# Altium PCB PCB1.PcbDoc (part 4 of 5)
Units mm, origin at the board's own origin, x right, y up, seen from the top; angles counter-clockwise.
Board outline 130 x 90 mm, 4 copper layers (Top Layer, Int 1 (GND), Int 2 (PWR), Bottom Layer), stack 1.466 mm thick; 419 components, 281 nets, 1355 pads, 522 vias.
Unrouted connection lines stored in the file: 26.
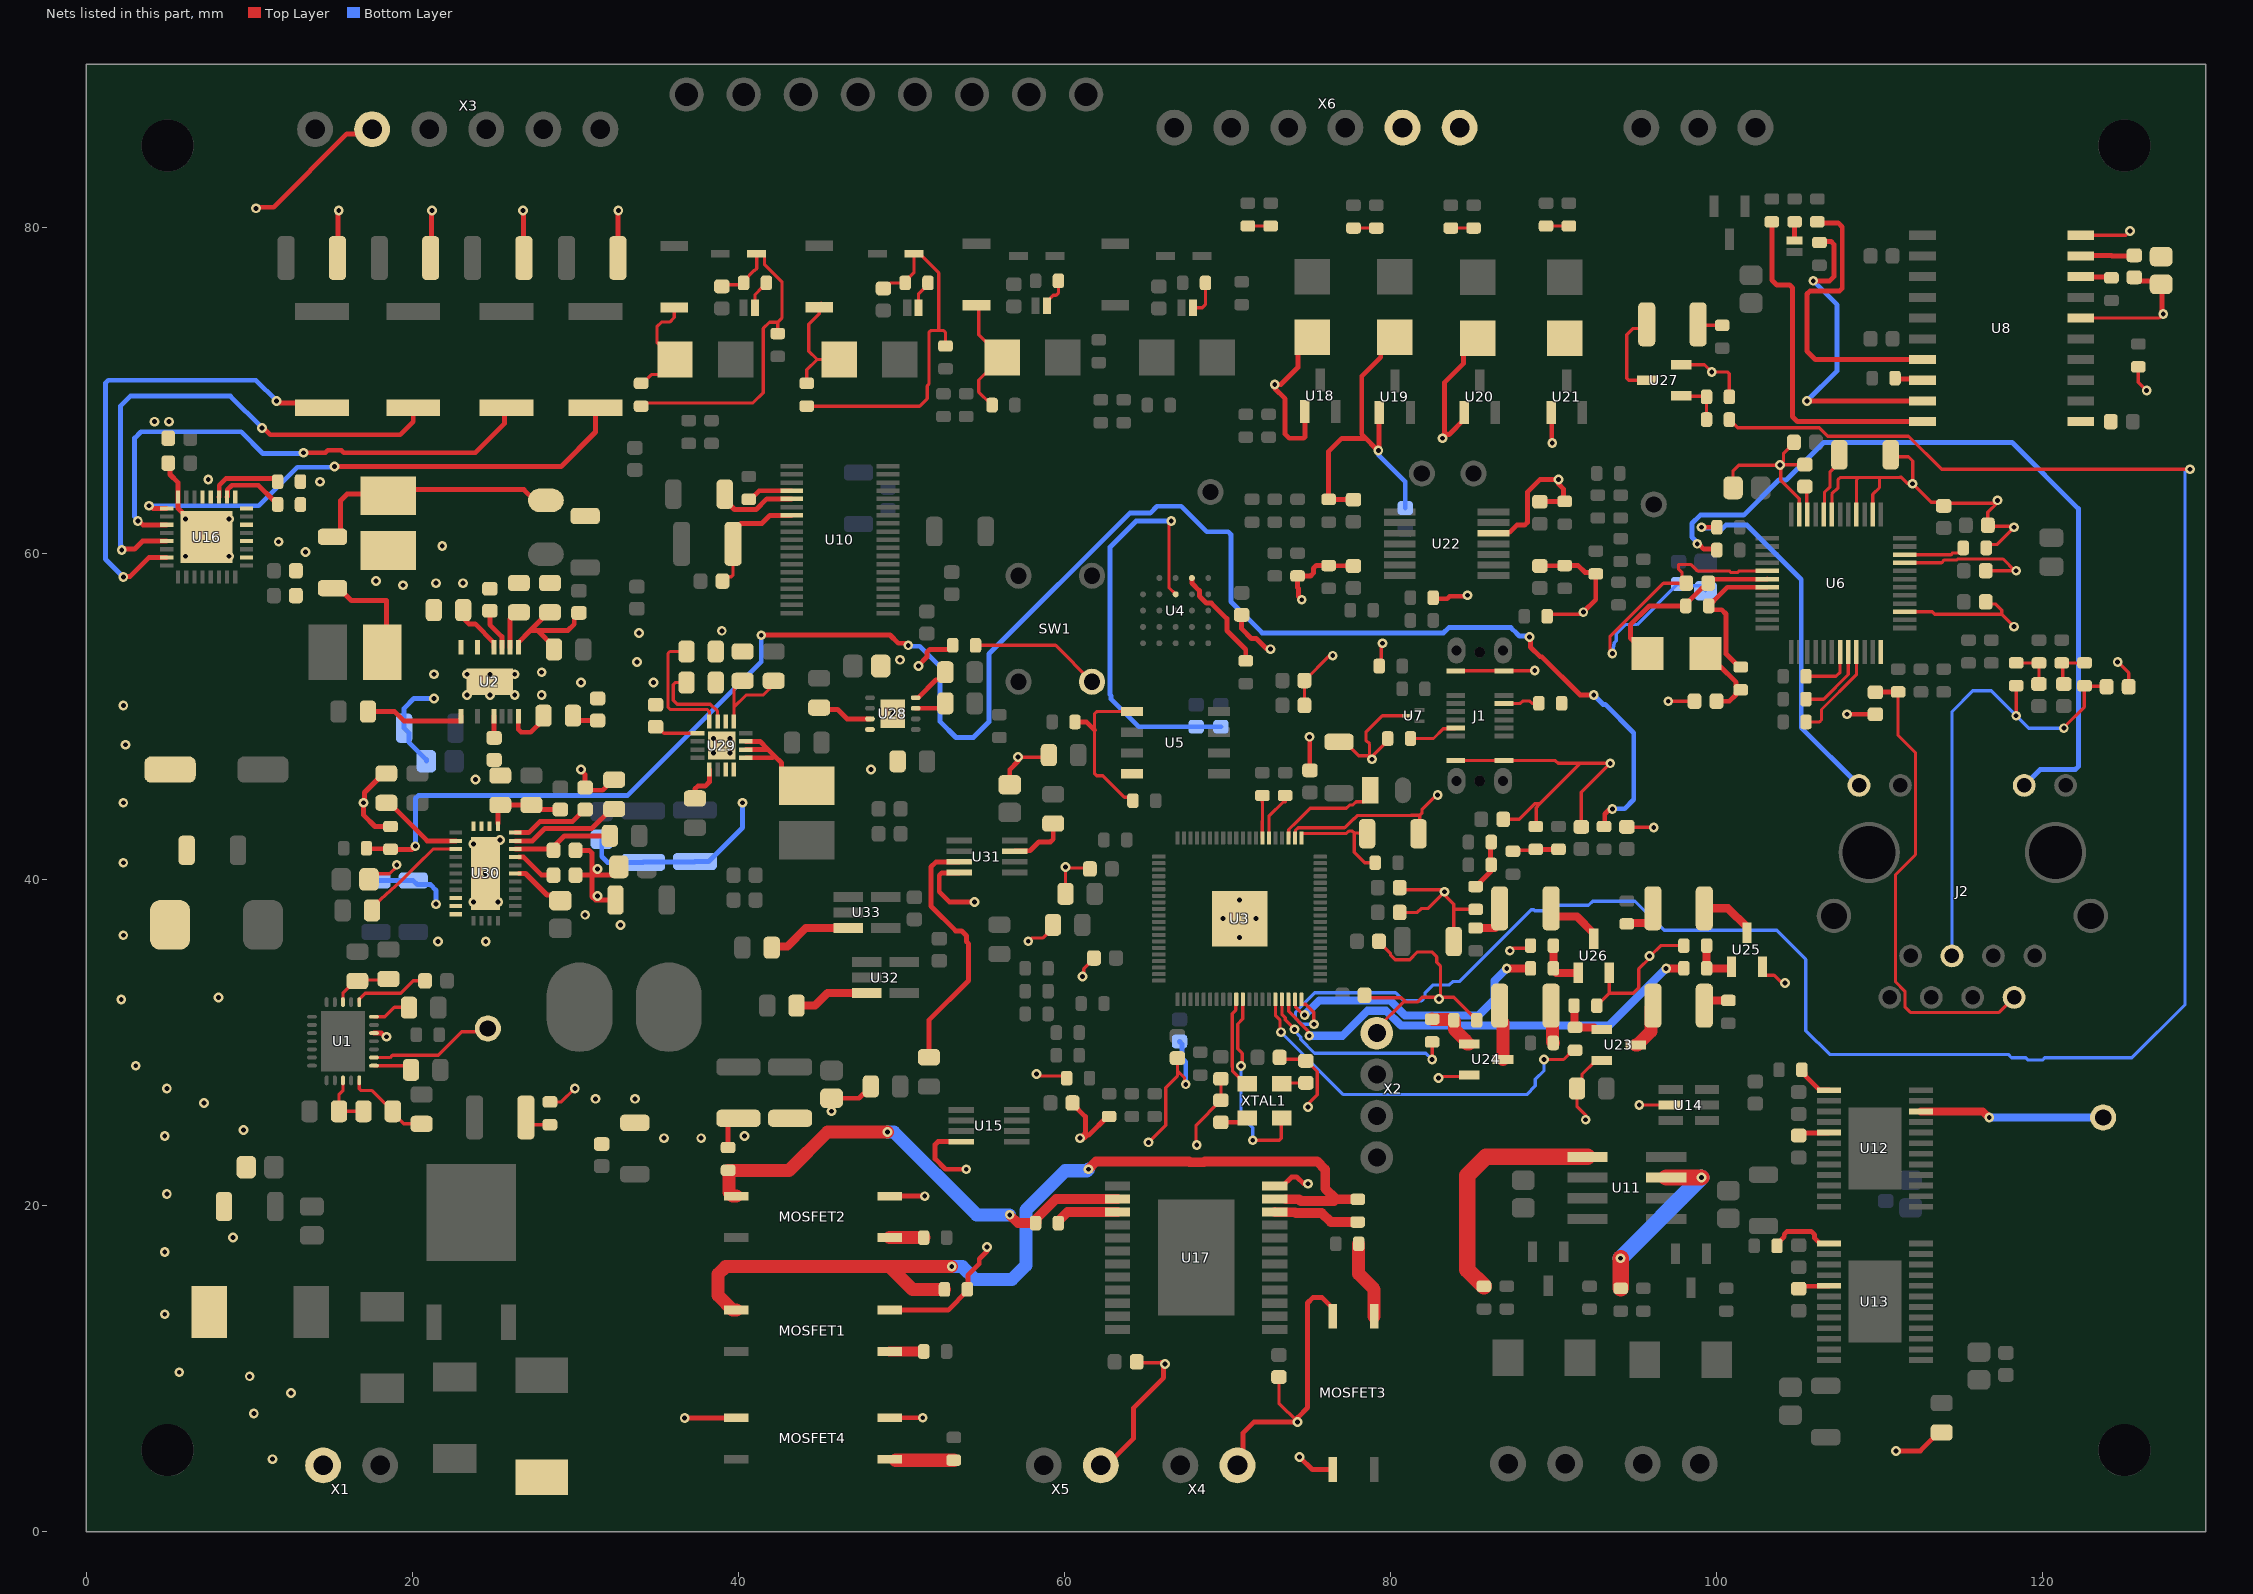
[diagram p6: the nets of this part, all layers, seen from the top]

## Via types
v1: diameter 0.6, hole 0.3, Top Layer to Bottom Layer, tented both sides, 508 vias
v2: diameter 0.6, hole 0.3, Top Layer to Bottom Layer, 14 vias

## Nets (pads, with @x,y where several pads share a name; then routed paths per layer and width w, separated by ;. In a path a pad name is that pad's centre, name@x,y a point inside that pad or via, vN(x,y) a via of type N, cw(c..) or ccw(c..) an arc to the next point about the centre after c; other vN are vias at no path point) (continued)
GND_SYS: C1.2 C2.2 C4.2 C5.2 C6.1 C7.1 C8.1 C9.1 C10.2 C13.1 C14.1 C15.2 C16.1 C17.1 C18.1 C19.1 C20.1 C21.1 C22.1 C23.1 C24.1 C25.1 C26.1 C27.1 C28.1 C29.1 C30.1 C31.1 C32.1 C33.1 C34.1 C35.1 C36.1 C37.1 C38.1 C39.2 C40.2 C41.2 C42.1 C43.1 C44.1 C45.1 C46.2 C47.1 C48.2 C49.2 C50.1 C53.2 C54.1 C56.1 C90.2 C91.2 C92.2 C93.1 C94.1 C95.2 C96.2 C97.1 C98.1 C99.2 C100.2 C101.2 C102.2 C103.1 C104.2 C105.2 C106.2 C107.1 C108.2 C109.1 C110.2 C111.1 C112.2 C114.1 C115.2 C117.1 C118.2 C119.1 C120.2 C121.1 C122.1 CR1.2 CR2.2 CR16.2 CR17.2 CR18.2 CR19.2 D1.1 D3.2 D4.2 D5.2 D6.2 J1.A1 J1.A12 J1.B1 J1.B12 L2.2 MOSFET1.3 MOSFET2.3 MOSFET3.3 MOSFET3.4 MOSFET4.3 MOSFET4.4 R11.2 R14.2 R22.2 R24.2 R26.2 R27.1 R35.1 R43.1 R47.1 R49.1 R54.2 R94.2 R95.2 R102.1 R103.1 R107.2 R108.2 R112.2 R113.2 R114.2 R115.2 R124.1 R125.1 R126.1 R128.1 R145.1 R146.1 R147.1 R148.1 R149.1 R150.2 R156.1 R159.2 R161.1 R162.1 R163.1 R165.1 R167.2 R174.2 R175.2 R176.2 R179.1 R182.2 R183.1 U1.17 U2.17 U3.62 U3.81 U4.B3 U5.4 U6.3 U6.9 U6.14 U6.16 U6.19 U6.23 U6.29 U6.48 U7.3 U8.6 U8.10 U14.2 U15.4 U16.18 U16.20 U16.22 U16.24 U16.25 U16.28 U16.29 U16.32 U16.33 U17.24 U18.1 U19.1 U20.1 U21.1 U22.12 U23.2 U24.2 U25.2 U26.2 U27.2 U28.4 U28.9 U29.6 U29.15 U29.16 U29.17 U30.13 U30.14 U30.15 U30.24 U30.25 U30.26 U30.31 U31.4 X1.1 X2.1 X3.5 X4.2 X5.2 X6.1 X6.2 | length 484.9
  Top Layer w0.2: C111.1@17.349,40.005 17.69,40.346 18.609,40.346 19.05,40.787 v1(19.05,40.894) ; R150.2@28.448,26.354 29.148,26.354 v1(29.972,27.178) ; v1(57.15,47.498) 58.917,47.498 R167.2@59.044,47.625 ; v1(57.781,36.205) 57.976,36.4 58.656,36.4 59.298,37.041 R176.2@59.298,37.211 ; v1(58.293,28.067) 58.42,27.94 60.006,27.94 R94.2@60.133,27.813 ; R175.2@60.06,39.116 60.066,39.122 60.066,40.762 v1(60.071,40.767) 60.134,40.703 61.492,40.703 C20.1@61.555,40.64 ; v1(61.113,34.053) 61.19,34.13 61.19,34.51 61.809,35.129 C21.1@61.809,35.179 ; C93.1@64.429,10.414 64.488,10.355 65.862,10.355 65.922,10.414 66.04,10.414 v1(66.167,10.287) ; v1(65.156,23.876) 66.207,24.927 66.207,27.218 66.929,27.94 66.929,28.265 ; v1(66.548,61.976) 66.41,61.838 66.41,57.891 U4.B3@66.818,57.483 ; C23.1@66.929,29.043 66.929,28.265 ; v1(67.437,27.432) 67.36,27.509 67.36,27.834 66.929,28.265 ; v1(68.115,23.709) 68.072,23.752 68.072,24.921 69.596,26.445 C24.1@69.596,27.773 ; C98.1@73.152,9.485 73.152,7.874 v1(74.295,6.731) ; C33.1@73.192,29.083 73.299,28.976 74.696,28.976 C15.2@74.803,28.869 74.853,28.869 75.503,28.219 75.503,26.784 74.93,26.211 v1(74.93,26.035) ; U3.62@74.136,42.545 74.161,42.57 74.161,43 74.336,43.175 75.752,43.175 75.764,43.163 77.179,43.163 77.73,43.714 77.78,43.714 77.99,43.924 81.242,43.924 81.26,43.942 81.788,43.942 ; C25.1@74.716,50.673 C22.1@74.716,52.197 74.727,52.197 76.251,53.721 v1(76.454,53.721) ; C28.1@76.708,48.438 77.189,48.438 78.051,47.576 78.662,47.576 v1(78.867,47.371) ; C19.1@78.399,32.893 78.548,32.744 80.67,32.744 80.854,32.559 ; X2.1@79.153,30.569 79.153,30.858 80.854,32.559 ; C18.1@79.288,36.195 79.248,36.195 79.996,35.447 79.996,35.348 80.274,35.07 81.168,35.07 81.651,35.553 82.525,35.553 82.832,35.245 82.832,34.92 83.058,34.695 83.058,32.893 v1@82.931,32.766 ; R43.1@79.31,53.086 79.425,53.201 79.425,54.406 v1(79.502,54.483) ; R47.1@79.818,48.641 79.818,48.5 78.867,47.549 v1(78.867,47.371) ; C27.1@80.558,37.973 81.639,37.973 81.876,38.21 82.279,38.21 v1(83.312,39.243) ; C17.1@80.558,39.497 80.685,39.37 83.185,39.37 v1(83.312,39.243) ; U7.3@81.036,50.038 79.502,50.038 78.486,49.022 78.486,48.532 78.712,48.306 78.712,47.526 v1(78.867,47.371) ; C26.1@81.712,42.799 81.788,42.875 81.788,43.942 ; v1(82.886,45.174) 82.801,45.174 81.929,44.302 81.929,44.083 81.788,43.942 ; v1(82.931,27.813) 83.026,27.908 84.715,27.908 U24.2@84.811,28.003 ; v1(82.968,32.668) 82.87,32.766 81.932,32.766 81.644,32.478 80.936,32.478 80.854,32.559 ; v1@82.968,32.766 83.885,32.766 84.978,31.673 85.038,31.673 85.282,31.428 R146.1@85.282,31.369 ; v1@83.439,39.37 v1(83.312,39.243) ; C29.1@83.871,36.195 83.871,38.1 ; J1.A1@83.986,47.288 90.099,47.288 90.27,47.117 91.639,47.117 ; J1.A12@83.986,52.788 J1.B1@86.956,52.788 86.965,52.797 88.832,52.797 v1(88.84,52.806) ; R26.2@85.217,38.162 83.933,38.162 83.871,38.1 ; C32.1@86.908,43.688 87.884,43.688 88.83,44.634 89.156,44.634 ; v1(87.313,35.623) 87.471,35.782 88.422,35.782 R148.1@88.581,35.941 ; R24.2@88.9,43.245 88.925,43.27 88.925,44.402 89.156,44.634 ; R128.1@89.6,56.134 89.727,56.261 91.694,56.261 v1(91.821,56.388) ; C31.1@91.694,43.22 91.694,45.339 v1(93.472,47.117) 91.639,47.117 ; v1(91.964,25.257) 91.964,25.542 91.429,26.076 R182.2@91.429,27.178 91.736,27.485 91.736,28.036 92.593,28.892 U23.2@92.939,28.892 ; R145.1@92.648,32.258 92.648,32.317 92.892,32.562 92.952,32.562 93.41,33.02 ; U26.2@93.408,34.265 93.408,33.022 93.41,33.02 ; v1(93.599,53.848) 93.45,53.997 93.45,54.885 96.731,58.166 C38.1@98.131,58.166 97.875,58.422 97.875,58.807 97.663,59.019 97.663,59.309 98.425,59.309 98.818,58.916 100.762,58.916 100.858,58.82 101.293,58.82 101.389,58.916 U6.29@103.099,58.916 ; C30.1@94.488,43.22 94.508,43.2 96.119,43.2 v1(96.139,43.18) ; v1(95.25,26.162) U14.2@97.18,26.162 ; v1(97.028,50.927) C44.1@98.639,50.927 ; U27.2@97.815,71.564 99.251,71.564 v1(99.695,71.12) 100.659,71.12 100.776,71.003 R149.1@100.776,69.596 ; R147.1@97.979,35.941 96.572,35.941 95.937,35.306 v1(95.885,35.306) 95.885,35.18 95.216,34.511 95.216,33.357 94.879,33.02 93.41,33.02 ; C49.2@101.004,64.008 101.004,65.063 101.346,65.405 v1(103.886,65.405) ; U25.2@102.806,34.646 102.806,34.3 102.99,34.116 103.516,34.116 103.977,33.655 v1(104.181,33.655) ; C41.2@104.735,66.802 104.735,66.752 104.091,66.108 104.091,65.61 v1(103.886,65.405) ; U6.23@105.065,62.382 105.065,63.337 103.932,64.47 103.932,65.359 v1(103.886,65.405) ; C45.1@105.41,65.445 105.39,65.425 103.906,65.425 v1(103.886,65.405) ; U6.19@107.065,62.382 107.065,63.64 107.442,64.017 107.442,64.526 107.559,64.643 108.964,64.643 108.966,64.645 109.981,64.651 ; U6.16@108.565,62.382 108.565,64.496 108.653,64.584 ; U6.14@109.565,62.382 109.565,63.611 109.981,64.027 109.981,64.651 ; C43.1@110.668,66.04 110.795,65.913 111.76,65.913 112.014,65.659 v1(112.014,64.262) ; U6.3@111.531,56.416 113.217,56.416 113.372,56.261 117.475,56.261 ; U6.9@111.531,59.416 113.792,59.416 113.967,59.591 114.718,59.591 114.777,59.65 117.562,59.65 118.284,58.928 v1(118.364,58.928) C40.2@116.499,58.928 ; C48.2@116.499,57.023 116.639,56.883 117.107,56.883 117.475,56.515 117.475,56.261 ; R35.1@116.524,60.325 116.731,60.532 117.174,60.532 v1(118.237,61.595) 118.173,61.658 116.689,61.658 C46.2@116.626,61.722 116.626,62.519 117.221,63.114 v1(117.221,63.246) 117.051,63.076 114.09,63.076 C39.2@113.919,62.905 113.692,63.132 113.144,63.132 v1(112.014,64.262) ; v1(118.237,55.499) 117.475,56.261 ; U8.6@122.326,74.422 127.127,74.422 v1(127.381,74.676) ; U8.10@122.326,79.502 125.095,79.502 v1(125.349,79.756) ; v1(124.587,53.34) 125.262,52.665 C53.2@125.262,51.816 ; R54.2@125.857,71.436 125.857,70.485 v1(126.365,69.977) ; v1(83.312,39.243) 83.312,39.039 83.871,38.48 83.871,38.1 ; 89.156,44.634 91.639,47.117 ; 109.981,64.651 111.251,64.659 111.328,64.659 111.724,64.262 v1(112.014,64.262)
  Top Layer w0.3: C96.2@5.04,65.532 5.148,65.424 5.148,64.829 5.644,64.333 U16.32@5.644,63.444 5.644,62.746 U16.33@7.394,60.996 U16.33@7.644,60.746 ; v1(10.414,81.153) 10.484,81.223 11.499,81.223 15.993,85.717 17.26,85.717 X3.5@17.543,86 ; D6.2@15.418,78.105 15.456,78.143 15.456,80.988 v1(15.494,81.026) ; U1.17@17.653,30.575 18.112,30.575 18.334,30.353 v2(18.415,30.353) ; L2.2@18.288,59.92 L2.2@18.542,60.174 ; R161.1@18.415,46.493 18.24,46.493 17.075,45.328 17.075,44.761 v1(17.018,44.704) 17.018,43.942 17.715,43.245 R22.2@18.669,43.245 ; D5.2@21.133,78.105 21.171,78.143 21.171,80.988 v1(21.209,81.026) ; R174.2@25.171,46.366 R174.2@25.4,46.366 ; v1(26.797,81.026) 26.823,81 26.823,78.131 D4.2@26.848,78.105 ; R14.2@28.425,58.2 R14.2@28.448,58.177 ; C112.2@30.012,40.259 31.028,40.259 ; C114.1@30.012,41.783 30.852,41.783 31.028,41.607 31.028,40.259 ; v1(30.353,46.736) 30.353,46.676 30.607,46.422 C105.2@30.607,45.633 30.774,45.466 31.684,45.466 31.922,45.703 31.922,45.77 32.264,46.112 R165.1@32.385,46.112 ; C120.2@32.461,38.735 31.511,38.735 31.508,38.732 31.245,38.732 31.028,38.949 31.028,40.259 ; D3.2@32.614,78.105 32.627,78.117 32.627,81.014 v1(32.639,81.026) ; C118.2@32.678,40.767 32.678,40.748 32.189,40.259 31.028,40.259 ; v1(36.71,6.979) 36.713,6.982 39.875,6.982 MOSFET4.4@39.878,6.985 ; R103.1@39.37,23.56 39.37,24.983 39.736,25.349 C117.1@40.005,25.349 ; R156.1@40.132,53.848 R156.1@40.259,53.975 ; C121.1@45.72,26.582 47.399,26.582 47.659,26.842 47.78,26.842 48.122,27.184 R183.1@48.122,27.305 ; C106.2@48.915,53.272 C106.2@48.729,53.086 C106.2@48.932,52.883 ; MOSFET4.3@49.276,6.985 v1(51.308,6.985) ; MOSFET1.3@49.276,13.589 52.87,13.589 54.077,14.795 54.077,15.723 54.772,16.418 54.772,16.719 55.246,17.194 v1(55.246,17.457) ; MOSFET2.3@49.276,20.574 v1(51.435,20.574) ; v1@50.942,53.086 v1(51.054,53.086) 51.054,53.131 51.562,53.639 51.562,53.926 51.738,54.102 52.95,54.102 53.148,54.3 R27.1@53.148,54.356 ; U31.4@53.55,40.427 53.522,40.399 52.472,40.399 52.324,40.251 52.324,39.243 52.959,38.608 v1(54.483,38.608) ; U15.4@53.677,23.917 52.246,23.917 52.07,23.741 52.07,22.86 52.705,22.225 v1(53.975,22.225) ; C122.1@56.642,45.808 56.642,46.736 57.15,47.244 v1(57.15,47.498) ; C90.2@60.492,26.289 60.492,26.239 61.282,25.449 61.282,24.198 61.214,24.13 v1(60.96,24.13) 61.146,24.316 61.492,24.316 62.638,25.462 R95.2@62.738,25.462 ; X5.2@62.23,4.064 62.583,4.064 64.243,5.724 64.243,7.601 66.081,9.439 66.081,10.201 v1(66.167,10.287) ; X4.2@70.612,4.064 70.937,4.389 70.937,6.04 71.628,6.731 v1(74.295,6.731) 74.295,6.993 74.905,7.603 74.905,14.023 75.233,14.351 75.801,14.351 76.454,13.698 MOSFET3.3@76.454,13.208 ; C35.1@70.866,56.221 70.866,55.372 71.464,54.774 71.763,54.774 72.42,54.118 v1(72.641,54.118) ; U17.24@72.898,21.209 73.388,21.209 73.932,21.753 74.247,21.753 74.668,21.333 v1(74.93,21.333) ; v1(74.422,4.572) 74.432,4.572 75.194,3.81 MOSFET3.4@76.454,3.81 ; v1(74.549,57.15) 74.363,57.336 74.363,57.832 74.295,57.901 R126.1@74.295,58.609 75.09,58.609 75.266,58.785 75.266,59.071 75.442,59.247 R113.2@76.2,59.247 76.213,59.235 77.712,59.235 C100.2@77.724,59.222 ; U18.1@74.739,68.682 74.739,67.12 74.676,67.056 73.787,67.056 73.533,67.31 73.533,69.469 72.898,70.104 v1(72.898,70.358) 73.279,70.358 74.316,71.395 74.316,72.38 CR16.2@75.184,73.248 ; v1(75.033,48.744) 75.045,48.732 75.045,46.701 C34.1@75.057,46.689 ; C99.2@77.724,63.286 77.712,63.299 76.213,63.299 R112.2@76.2,63.311 76.2,66.245 77.003,67.048 78.468,67.048 79.074,66.442 v1@79.1,66.442 ; U19.1@79.311,68.631 79.28,68.599 79.28,66.326 v1(79.248,66.294) v1@79.1,66.442 ; CR17.2@80.264,73.248 79.396,72.38 79.396,72.03 78.232,70.866 78.232,67.31 v1@79.1,66.442 ; R124.1@82.615,57.277 82.679,57.213 83.474,57.213 83.624,57.364 84.649,57.364 v1(84.709,57.423) ; v1(83.185,67.056) 83.312,67.183 83.312,67.424 ; U20.1@84.519,68.631 84.519,68.209 83.592,67.283 83.454,67.283 83.312,67.424 ; CR18.2@85.344,73.2 84.476,72.332 84.476,71.649 83.312,70.485 83.312,67.424 ; U22.12@86.314,61.229 86.375,61.289 87.302,61.289 87.734,61.722 88.216,61.722 88.392,61.898 88.392,63.754 89.154,64.516 v1(90.297,64.516) 90.297,64.254 90.592,63.959 90.592,63.27 R115.2@90.678,63.184 90.666,63.172 89.167,63.172 C102.2@89.154,63.159 ; C101.2@89.154,59.222 89.167,59.235 90.666,59.235 R114.2@90.678,59.247 91.502,59.247 91.931,58.818 92.501,58.818 R125.1@92.583,58.736 92.583,57.16 91.821,56.398 v1(91.821,56.388) ; U21.1@89.852,68.631 89.884,68.599 89.884,66.793 v1(89.916,66.761) ; v1@107.95,50.165 v1(107.99,50.125) C50.1@109.728,50.125 ; v1(110.998,4.953) 112.485,4.953 113.617,6.085 R179.1@113.792,6.085 ; C54.1@125.603,76.922 125.818,76.708 127.039,76.708 C56.1@127.254,76.493 127.317,76.43 127.317,74.739 v1(127.381,74.676)
  Bottom Layer w0.2: v1(93.599,53.848) 93.715,54.508 93.833,54.625 93.833,55.072 94.386,55.626 95.113,55.626 97.613,58.126 C47.1@97.663,58.126 97.778,58.012 98.999,58.012 C42.1@99.314,57.697
  Bottom Layer w0.3: C107.1@17.78,39.929 C109.1@20.066,39.929 20.31,39.685 21.112,39.685 21.287,39.509 21.287,39.497 21.463,39.321 v1(21.463,38.481) ; C8.1@20.867,47.244 20.867,47.344 19.795,48.416 19.795,48.988 C6.1@19.507,49.276 19.507,50.495 20.106,51.094 v1(21.336,51.094) ; C104.2@31.623,42.457 31.623,41.402 31.979,41.046 C110.2@34.163,41.046 34.189,41.071 37.312,41.071 C108.2@37.338,41.097 38.176,41.097 40.259,43.18 v1(40.259,44.704) ; v1(66.548,61.976) 64.389,61.976 62.798,60.385 62.798,51.324 62.865,51.257 62.865,51.054 64.556,49.363 C36.1@68.072,49.363 C37.1@69.596,49.363 ; C16.1@67.056,30.059 67.215,29.9 67.215,29.032 67.437,28.81 v1(67.437,27.432) ; v1(79.248,66.294) 79.248,66.044 80.899,64.393 C103.1@80.899,62.778
  other v1: 11.43,4.445 10.287,7.239 12.573,8.509 10.033,9.525 5.715,9.779 4.826,13.335 4.826,17.145 9.017,18.034 4.953,20.701 35.433,24.13 37.719,24.13 4.826,24.257 40.386,24.257 9.652,24.638 45.72,25.781 7.239,26.289 31.242,26.543 33.655,26.543 4.953,27.178 3.048,28.575 2.159,32.639 8.128,32.766 21.59,36.195 24.511,36.195 70.739,36.449 2.286,36.576 32.766,37.211 69.723,37.592 71.755,37.592 30.607,37.829 23.749,38.608 25.273,38.608 70.739,38.735 31.369,38.989 24.499,40.365 31.369,40.64 2.286,41.021 23.749,42.164 25.39,42.408 2.286,44.704 23.876,46.118 48.133,46.736 38.481,47.752 39.497,47.752 2.413,48.26 38.481,48.641 39.497,48.641 49.474,50.168 2.286,50.673 23.368,51.308 24.765,51.308 26.289,51.308 27.94,51.308 30.353,52.07 34.798,52.07 21.336,52.578 23.368,52.578 24.765,52.578 26.289,52.578 27.94,52.705 33.782,53.34 49.911,53.467 33.909,55.118 38.989,55.245 19.431,58.039 21.463,58.166 23.114,58.166 17.78,58.293 6.096,59.817 8.763,59.817 13.462,60.071 21.844,60.452 11.811,60.706 6.096,62.103 8.763,62.103 14.351,64.389 7.493,64.516 4.191,68.072 5.08,68.072
IPS_IN1: MOSFET1.4 R102.2 R109.2 U17.23 | length 56.3
  Top Layer w0.6: v1(61.468,22.225) 61.938,22.695 67.63,22.695 67.676,22.649 68.554,22.649 68.6,22.695 75.506,22.695 75.99,22.211 75.99,21.038 76.643,20.385 ; U17.23@73.575,20.385 74.379,20.385 74.491,20.273 76.531,20.273 76.643,20.385 ; R109.2@77.978,20.385 76.643,20.385
  Top Layer w0.8: MOSFET1.4@39.878,13.589 39.655,13.589 38.755,14.49 38.755,15.787 39.223,16.256 49.276,16.256 ; R102.2@52.64,14.859 50.673,14.859 49.276,16.256 ; v1(53.086,16.256) 49.276,16.256
  Bottom Layer w0.8: v1(53.086,16.256) 53.732,16.256 54.511,15.477 56.786,15.477 57.634,16.325 57.634,19.721 60.047,22.134 61.377,22.134 v1(61.468,22.225)
IPS_IN2: MOSFET2.4 R103.2 R106.1 U17.2 | length 30.2
  Top Layer w0.6: v1(56.642,19.431) 57.15,18.923 R106.1@58.228,18.923 ; U17.2@63.246,20.409 59.487,20.409 58.278,19.2 R106.1@58.278,18.941 ; R106.1@58.228,18.891 R106.1@58.244,18.907 ; R106.1@58.228,18.891 R106.1@58.244,18.907 ; R106.1@58.228,18.891 R106.1@58.244,18.907 ; R106.1@58.228,18.891 R106.1@58.244,18.907 ; R106.1@58.244,18.907 R106.1@58.278,18.941 ; R106.1@58.244,18.907 R106.1@58.278,18.941 ; R106.1@58.244,18.907 R106.1@58.278,18.941 ; R106.1@58.244,18.907 R106.1@58.278,18.941 ; R106.1@58.244,18.907 R106.1@58.278,18.941 ; R106.1@58.244,18.907 R106.1@58.278,18.941
  Top Layer w0.8: MOSFET2.4@39.878,20.574 39.655,20.574 39.42,20.809 39.42,22.11 R103.2@39.37,22.16 43.115,22.16 45.466,24.511 v1(49.149,24.511)
  Bottom Layer w0.8: v1(49.149,24.511) 49.53,24.511 54.61,19.431 v1(56.642,19.431)
LED_AO: R142.1 U3.38 | length 28.2
  Top Layer w0.2: U3.38@73.736,32.645 73.761,32.62 73.761,31.903 74.932,30.732 74.932,30.488 v1(75.008,30.412)
  Top Layer w0.5: v1(96.901,34.544) R142.1@97.979,34.544
  Bottom Layer w0.5: v1(75.008,30.412) 77.051,30.412 78.583,31.944 79.723,31.944 80.634,31.033 93.39,31.033 v1(96.901,34.544)
LED_DO: R143.1 U3.39 | length 17.7
  Top Layer w0.2: U3.39@74.136,32.645 74.161,32.62 74.161,32.19 74.674,31.677 v1(74.73,31.677)
  Top Layer w0.5: v1(87.122,34.544) R143.1@88.581,34.544
  Bottom Layer w0.5: v1(74.73,31.677) 75.622,32.569 79.981,32.569 80.892,31.658 85.379,31.658 86.363,32.642 86.363,33.785 v1(87.122,34.544)
LED_FAULT: R141.1 U3.37 | length 12.6
  Top Layer w0.2: U3.37@73.336,32.645 73.336,31.719 73.536,31.519 73.536,31.386 v1(74.114,30.807) ; v1(82.55,28.956) R141.1@82.55,30.034
  Bottom Layer w0.2: v1(74.114,30.807) 74.114,30.705 74.487,30.332 74.487,30.19 75.333,29.344 82.162,29.344 v1(82.55,28.956)
LED_RS485: R144.1 U3.40 | length 132.2
  Top Layer w0.2: U3.40@74.536,32.645 74.536,32.365 74.561,32.34 74.809,32.34 75.294,31.855 75.294,31.132 v1(75.311,31.115) ; R144.1@100.776,68.199 101.284,67.691 106.29,67.691 106.798,67.183 111.76,67.183 113.792,65.151 v1(129.032,65.151)
  Bottom Layer w0.2: v1(75.311,31.115) 74.549,31.115 74.168,31.496 74.168,31.857 75.355,33.044 80.308,33.044 80.801,32.551 81.9,32.551 82.108,32.758 82.108,33.024 82.612,33.528 83.596,33.528 83.803,33.735 84.208,33.735 88.614,38.141 88.78,38.141 88.836,38.085 89.67,38.085 89.995,38.41 92.136,38.41 92.39,38.664 94.988,38.664 96.774,36.878 103.68,36.878 105.466,35.093 105.466,30.726 106.926,29.266 117.879,29.266 118.079,29.066 118.961,29.066 119.105,28.922 119.978,28.922 120.122,29.066 125.459,29.066 128.722,32.329 128.722,65.034 128.763,65.074 128.955,65.074 v1(129.032,65.151)
LED_RUN: R140.1 U3.36 | length 23.5
  Top Layer w0.2: U3.36@72.936,32.645 72.936,31.659 73.211,31.384 73.211,30.701 v1(73.279,30.633) ; v1(89.408,28.956) 90.608,28.956 91.178,29.526 R140.1@91.313,29.526
  Bottom Layer w0.2: v1(73.279,30.633) 77.108,26.804 88.345,26.804 88.877,27.335 88.877,27.741 89.408,28.273 v1(89.408,28.956)
MANUAL_RESET_N: R158.2 U28.3 | length 3.4
  Top Layer w0.3: R158.2@44.958,50.535 45.067,50.426 46.083,50.426 46.666,49.843 U28.3@48.074,49.843
NetC3_2: C3.2 U1.20 | length 4.7
  Top Layer w0.2: U1.20@16.753,32.475 16.753,32.655 17.118,33.02 19.304,33.02 20.066,33.782 C3.2@20.788,33.782
NetC7_2: C7.2 R9.1 | length 1.6
  Top Layer w0.3: R9.1@29.856,50.038 30.15,49.744 C7.2@31.369,49.744
NetC9_2: C9.2 U2.5 | length 1.3
  Top Layer w0.3: U2.5@25.004,50.013 25.006,50.01 25.006,48.694 C9.2@25.019,48.681
NetC10_1: C10.1 U2.11 | length 2.6
  Top Layer w0.3: C10.1@24.765,56.475 24.765,55.626 25.502,54.889 25.502,54.231 U2.11@25.504,54.229
NetC11_1: C11.1 R12.1 R14.1 U2.9 | length 8.3
  Top Layer w0.3: U2.9@26.505,54.229 26.505,54.521 27.245,55.261 ; R14.1@28.448,56.377 28.327,56.377 27.985,56.035 27.985,56.001 27.245,55.261 ; R12.1@28.691,54.102 28.691,54.277 27.707,55.261 ; C11.1@30.226,56.348 30.21,56.348 29.94,56.078 29.94,55.658 29.542,55.261 27.707,55.261 ; 27.245,55.261 27.707,55.261
NetC12_1: C12.1 L1.1 R13.2 U2.14 U2.16 | length 7.8
  Top Layer w0.3: C12.1@15.113,57.861 15.513,57.861 16.275,57.099 18.415,57.099 18.415,54.171 L1.1@18.169,53.925 L1.1@18.626,53.467 ; R13.2@21.325,56.134 R13.2@21.336,56.123 ; U2.14@24.003,54.229 U2.14@24.003,54.521
NetC12_2: C12.2 D2.1 L2.1 | length 15.7
  Top Layer w0.3: C12.2@15.113,61.011 15.271,61.011 15.613,61.353 15.613,63.238 16.002,63.627 18.439,63.627 L2.1@18.542,63.524 18.923,63.905 26.848,63.905 27.508,63.245 D2.1@28.194,63.245
NetC14_2: C14.2 XTAL1.4 | length 1.7
  Top Layer w0.3: C14.2@69.596,25.106 70.951,25.106 XTAL1.4@71.211,25.366
NetC15_1: C15.1 XTAL1.2 | length 1.5
  Top Layer w0.2: XTAL1.2@73.315,27.466 73.368,27.519 C15.1@74.803,27.519
NetC26_2: C26.2 R20.1 U3.61 | length 7
  Top Layer w0.2: U3.61@74.536,42.545 74.536,42.794 74.561,42.819 77.295,42.819 77.442,42.966 77.654,42.966 77.771,42.849 ; C26.2@78.294,42.604 78.05,42.849 77.771,42.849 ; R20.1@79.056,41.021 78.406,41.021 77.771,41.655 77.771,42.849
NetC38_2: C38.2 R33.1 U6.30 XTAL2.1 | length 13.7
  Top Layer w0.3: XTAL2.1@95.758,53.848 94.979,54.627 94.869,54.627 94.708,54.788 94.708,55.613 95.864,56.769 R33.1@98.106,56.769 ; R33.1@98.106,56.869 99.117,57.88 99.211,57.88 99.481,58.15 C38.2@99.481,58.166 ; U6.30@103.099,58.416 103.088,58.406 C38.2@99.751,58.406 ; C38.2@99.481,58.135 C38.2@99.496,58.151 ; C38.2@99.481,58.135 C38.2@99.496,58.151 ; C38.2@99.481,58.135 C38.2@99.496,58.151 ; C38.2@99.481,58.135 C38.2@99.496,58.151 ; C38.2@99.481,58.135 C38.2@99.496,58.151 ; C38.2@99.481,58.135 C38.2@99.751,58.406 ; C38.2@99.496,58.151 C38.2@99.751,58.406 ; C38.2@99.496,58.151 C38.2@99.751,58.406 ; C38.2@99.496,58.151 C38.2@99.751,58.406 ; C38.2@99.496,58.151 C38.2@99.751,58.406 ; C38.2@99.496,58.151 C38.2@99.751,58.406
NetC43_2: C43.2 U6.20 | length 4.1
  Top Layer w0.2: U6.20@106.565,62.382 106.605,62.422 106.605,63.727 106.951,64.073 106.951,64.992 107.518,65.559 C43.2@107.518,66.04
NetC44_2: C44.2 R34.1 XTAL2.2 | length 5
  Top Layer w0.3: XTAL2.2@99.314,53.848 100.093,53.069 100.203,53.069 101.188,52.083 101.188,51.822 R34.1@101.387,51.624 ; C44.2@99.989,50.927 100.776,50.927 101.188,51.339 101.188,51.426 R34.1@101.387,51.624 ; R34.1@101.473,51.624 R34.1@101.387,51.624
NetC45_2: C45.2 U6.22 | length 1.8
  Top Layer w0.2: C45.2@105.41,64.095 105.525,63.98 105.525,62.422 U6.22@105.565,62.382
NetC50_2: C50.2 J2.2 R50.1 | length 29.1
  Top Layer w0.2: R50.1@111.114,51.486 111.114,48.856 112.19,47.78 112.19,41.523 110.963,40.296 110.963,33.726 111.541,33.149 111.541,32.179 111.877,31.842 117.313,31.842 J2.2@118.237,32.766
  Top Layer w0.3: C50.2@109.728,51.475 109.739,51.486 R50.1@111.114,51.486
NetC51_1: C51.1 R40.2 R45.1 | length 2.6
  Top Layer w0.2: C51.1@121.285,51.983 121.221,52.046 121.221,53.211 121.287,53.276 122.553,53.276 R45.1@122.555,53.278
NetC52_1: C52.1 R39.2 R44.1 | length 2.8
  Top Layer w0.2: R44.1@118.223,53.278 R44.1@118.364,53.278 118.366,53.276 119.759,53.276 R39.2@119.761,53.275 C52.1@119.761,51.983
NetC53_1: C53.1 J2.5 R44.2 R45.2 | length 29.7
  Top Layer w0.2: v1(118.364,50.038) R44.2@118.364,51.878 ; v1(121.285,49.276) 121.285,49.316 122.535,50.566 122.535,51.858 R45.2@122.555,51.878 122.586,51.847 123.881,51.847 C53.1@123.912,51.816
  Bottom Layer w0.2: J2.5@114.427,35.306 114.427,50.292 115.697,51.562 116.84,51.562 v1(118.364,50.038) 119.126,49.276 v1(121.285,49.276)
NetC54_2: C54.2 C56.2 U8.9 | length 3.6
  Top Layer w0.3: U8.9@122.326,78.232 122.346,78.252 124.186,78.252 124.206,78.272 124.246,78.233 125.818,78.233 C54.2@125.857,78.193
NetC55_2: C55.2 U8.1
NetC61_2: C61.2 U10.5 | length 5
  Top Layer w0.3: C61.2@39.167,63.627 39.167,63.281 39.765,62.683 41.101,62.683 41.751,63.333 U10.5@43.278,63.333
NetC62_2: C62.2 C63.1 U10.7 | length 7.5
  Top Layer w0.2: C62.2@39.029,58.293 39.3,58.564 39.558,58.564 39.675,58.681 C63.1@39.675,60.579
  Top Layer w0.3: C63.1@39.675,60.579 39.675,61.343 40.165,61.833 41.453,61.833 41.943,62.323 43.268,62.323 U10.7@43.278,62.333
NetC82_2: C82.2 U12.17 | length 1.9
  Top Layer w0.3: C82.2@105.029,24.297 105.179,24.447 106.856,24.447 U12.17@106.883,24.474
NetC85_2: C85.2 U13.17 | length 1.9
  Top Layer w0.3: C85.2@105.029,14.899 105.179,15.049 106.856,15.049 U13.17@106.883,15.076
NetC105_1: C105.1 U30.11 | length 4.9
  Top Layer w0.3: U30.11@26.324,42.865 27.149,42.865 27.828,43.544 29.818,43.544 30.557,44.283 C105.1@30.607,44.283
NetC112_1: C112.1 U30.8 | length 2.6
  Top Layer w0.3: U30.8@26.549,41.365 26.834,41.365 27.94,40.259 C112.1@28.662,40.259
NetC113_1: C113.1 U30.6 | length 3.2
  Top Layer w0.3: U30.6@26.549,40.365 26.945,40.365 28.268,39.042 28.737,39.042 C113.1@29.083,38.696
NetC114_2: C114.2 R171.1 U30.9 | length 9.7
  Top Layer w0.3: U30.9@26.324,41.865 28.48,41.865 C114.2@28.505,41.84 ; R171.1@32.12,42.672 29.337,42.672 ; C114.2@28.505,41.84 29.337,42.672 ; C114.2@28.505,41.84 29.337,42.672 ; C114.2@28.505,41.84 29.337,42.672 ; C114.2@28.505,41.84 29.337,42.672
NetC115_1: C115.1 U29.9 | length 2.7
  Top Layer w0.2: C115.1@34.925,49.363 35.036,49.363 35.438,48.961 U29.9@37.502,48.961
NetC116_2: C116.2 R172.1 R174.1 U30.12 | length 4.8
  Top Layer w0.3: U30.12@25.273,43.415 25.273,44.362 R174.1@25.362,44.451 ; R174.1@25.4,44.566 R172.1@27.305,44.566 ; R172.1@27.305,44.312 27.319,44.297 29.069,44.297 C116.2@29.083,44.283
NetD7_2: D7.2 R150.1 | length 1.7
  Top Layer w0.2: D7.2@26.975,25.4 26.975,25.366 27.388,24.954 R150.1@28.448,24.954
NetD8_1: D8.1 U23.3 | length 2.9
  Top Layer w0.8: U23.3@95.021,29.845 95.135,29.845 95.963,30.673 95.963,32.133 D8.1@96.088,32.258
NetD8_2: D8.2 R155.1 | length 1.6
  Top Layer w0.5: D8.2@99.238,32.258 99.238,32.303 99.512,32.577 R155.1@100.711,32.577
NetD9_1: D9.1 U24.3 | length 3.4
  Top Layer w0.8: D9.1@86.69,32.258 86.69,31.433 86.893,31.23 U24.3@86.893,28.956
NetD9_2: D9.2 R151.1 | length 2.3
  Top Layer w0.8: D9.2@89.84,32.258 89.931,32.167 89.931,30.022 R151.1@89.981,29.972
NetD10_1: D10.1 U25.3 | length 3.4
  Top Layer w0.5: D10.1@99.238,38.227 100.701,38.227 101.854,37.074 U25.3@101.854,36.728
NetD10_2: D10.2 R152.1 | length 2.4
  Top Layer w0.5: R152.1@94.488,37.273 94.546,37.331 95.814,37.331 96.088,37.605 D10.2@96.088,38.227
NetD11_1: D11.1 U26.3 | length 8.2
  Top Layer w0.5: U26.3@92.456,36.347 92.456,36.693 91.43,37.719 ; D11.1@89.84,37.719 91.43,37.719 ; D11.1@89.84,37.719 91.43,37.719 ; D11.1@89.84,37.719 91.43,37.719 ; D11.1@89.84,37.719 91.43,37.719
NetD11_2: D11.2 R153.1 | length 2
  Top Layer w0.5: R153.1@85.217,37.022 86.416,37.022 86.69,37.296 D11.2@86.69,37.719
NetD12_1: D12.1 U27.3 | length 5.5
  Top Layer w0.2: D12.1@95.707,74.041 95.453,73.787 94.869,73.787 94.488,73.406 94.488,70.729 94.605,70.612 U27.3@95.733,70.612
NetD12_2: D12.2 R154.1 | length 1.5
  Top Layer w0.2: D12.2@98.857,74.041 98.919,73.979 R154.1@100.33,73.979
NetJ1_A5: J1.A5 R47.2 | length 3
  Top Layer w0.2: R47.2@81.218,48.641 82.63,48.641 83.225,49.236 J1.A5@83.934,49.236
NetJ1_B5: J1.B5 R49.2 | length 1.9
  Top Layer w0.2: J1.B5@86.956,50.788 86.962,50.794 87.963,50.794 88.107,50.938 88.542,50.938 88.686,50.794 88.702,50.794 88.708,50.8
NetJ2_10: J2.10 R52.2 | length 50.2
  Top Layer w0.3: v1(98.806,60.579) 98.887,60.579 99.211,60.255 99.813,60.255 99.813,60.483 100.011,60.284 R52.2@100.011,60.198
  Bottom Layer w0.3: v1(98.806,60.579) 98.806,60.66 98.485,60.981 98.485,61.833 98.988,62.336 101.655,62.336 103.814,64.495 104.263,64.495 106.564,66.796 118.116,66.796 122.174,62.738 122.174,46.915 121.998,46.74 119.831,46.74 J2.10@118.857,45.766
NetJ2_12: J2.12 R53.2 | length 22.7
  Top Layer w0.3: v1(99.06,61.595) R53.2@100.011,61.595
  Bottom Layer w0.3: v1(99.06,61.595) 99.117,61.538 99.799,61.538 99.891,61.445 100.285,61.445 100.561,61.722 101.854,61.722 105.186,58.39 105.186,49.307 J2.12@108.727,45.766
NetJ3_1: J3.1 R60.1 | length 1.1
  Top Layer w0.3: J3.1@104.775,79.186 R60.1@104.775,80.326
NetJ6_1: J6.1 R68.2 | length 1.8
  Top Layer w0.2: J6.1@41.021,75.057 41.021,75.857 41.441,76.277 41.477,76.277 41.721,76.522 R68.2@41.721,76.581
NetJ7_1: J7.1 R69.2 | length 1.8
  Top Layer w0.2: J7.1@51.054,75.057 51.054,75.908 51.627,76.481 R69.2@51.627,76.581
NetJ8_1: J8.1 R70.2 | length 1.9
  Top Layer w0.2: J8.1@58.928,75.184 58.928,75.434 59.311,75.817 59.487,75.817 59.628,75.958 R70.2@59.628,76.708
NetJ9_1: J9.1 R71.2 | length 2.2
  Top Layer w0.2: J9.1@67.883,75.057 68.453,75.057 68.645,75.249 R71.2@68.645,76.581
NetL3_1: L3.1 U3.63 | length 6.5
  Top Layer w0.2: U3.63@73.736,42.545 73.761,42.57 73.761,43.06 74.242,43.541 75.066,44.364 77.287,44.364 77.486,44.563 77.682,44.563 77.885,44.766 78.356,44.766 78.486,44.896 L3.1@78.486,45.339
NetL4_2: L4.2 U29.1 U29.2 U29.3 | length 8.2
  Top Layer w0.3: U29.1@40.452,47.461 42.101,47.461 42.214,47.574 ; U29.2@40.452,47.961 41.738,47.961 41.783,48.006 ; U29.3@40.452,48.461 41.327,48.461 41.783,48.006 ; L4.2@44.196,45.744 43.681,45.744 42.646,46.779 42.646,47.142 42.214,47.574 ; 41.783,48.006 42.214,47.574
NetMOSFET1_1: MOSFET1.1 R96.2 | length 2
  Top Layer w0.6: MOSFET1.1@49.276,11.049 R96.2@51.243,11.049
NetMOSFET2_1: MOSFET2.1 R97.2 | length 2.1
  Top Layer w0.8: MOSFET2.1@49.276,18.034 R97.2@51.37,18.034
NetMOSFET3_1: MOSFET3.1 R104.2 | length 4.8
  Top Layer w0.8: R104.2@78.043,17.653 78.043,15.81 78.994,14.859 MOSFET3.1@78.994,13.208
NetMOSFET4_1: MOSFET4.1 R105.2 | length 3.6
  Top Layer w0.8: MOSFET4.1@49.632,4.38 R105.2@53.213,4.38
NetR2_2: R2.2 R3.2 U1.22 | length 3.7
  Top Layer w0.2: U1.22@15.753,32.475 15.753,33.025 16.499,33.771 R2.2@16.637,33.771 16.7,33.834 18.479,33.834 R3.2@18.542,33.898
NetR4_2: R4.2 U1.19 | length 2.4
  Top Layer w0.2: U1.19@17.653,31.575 18.323,31.575 18.912,32.164 19.768,32.164 R4.2@19.801,32.131
NetR5_1: R5.1 U1.13 | length 2.4
  Top Layer w0.2: U1.13@17.653,28.575 19.674,28.575 R5.1@19.928,28.321
NetR6_1: R6.1 R8.2 U1.12 | length 5.3
  Top Layer w0.2: U1.12@16.753,27.675 16.753,27.168 16.87,27.051 17.537,27.051 18.325,26.263 18.418,26.263 18.807,25.875 R8.2@18.807,25.781 18.807,25.687 19.486,25.008 R6.1@20.574,25.008
NetR7_2: R7.2 R8.1 U1.10 | length 3.5
  Top Layer w0.2: U1.10@15.753,27.675 15.753,27.038 15.505,26.79 R7.2@15.505,25.781 R8.1@17.007,25.781
NetR9_2: R9.2 U2.8 | length 3
  Top Layer w0.3: U2.8@26.505,50.013 26.505,49.198 26.681,49.022 27.269,49.022 28.056,49.809 R9.2@28.056,50.038
NetR10_2: R10.2 U2.1 | length 6.3
  Top Layer w0.3: R10.2@17.283,50.292 18.923,50.292 19.507,49.708 22.698,49.708 22.708,49.718 23,49.718 23.002,49.721 U2.1@23.002,50.013
NetR11_1: R11.1 U2.10 | length 2.4
  Top Layer w0.3: U2.10@26.005,54.229 26.005,55.959 26.422,56.377 R11.1@26.543,56.377
NetR13_1: R13.1 U2.12 | length 2.9
  Top Layer w0.3: R13.1@23.125,56.134 23.125,56.013 23.467,55.671 23.854,55.671 25.004,54.521 U2.12@25.004,54.229
NetR18_1: R18.1 U3.66 | length 3
  Top Layer w0.2: U3.66@72.536,42.545 72.536,43.869 73.433,44.766 ; 73.433,44.766 73.533,44.766 ; 73.433,44.766 73.533,44.766 ; 73.433,44.766 73.533,44.766 ; 73.433,44.766 73.533,44.766
NetR19_1: R19.1 U3.67 | length 2.2
  Top Layer w0.2: U3.67@72.136,42.545 72.136,43.561 72.142,43.567 72.142,44.76 72.136,44.766
NetR21_1: R21.1 R22.1 R_RP1.2 | length 114.5
  Top Layer w0.3: R21.1@17.199,41.91 17.232,41.877 18.636,41.877 R22.1@18.669,41.845 20.001,41.845 v1(20.193,42.037) ; v1(41.402,54.974) 41.419,54.991 49.298,54.991 49.806,54.483 50.292,54.483 v1(50.419,54.356) ; v1(88.519,54.864) 88.576,54.807 88.576,54.247 89.17,53.654 89.279,53.654 91.625,51.308 v1(92.456,51.308) ; R_RP1.2@93.091,43.245 93.136,43.29 93.136,44.009 93.392,44.266 93.542,44.266 v1(93.599,44.323)
  Bottom Layer w0.3: v1(20.193,42.037) 20.193,44.96 20.369,45.136 33.198,45.136 41.402,53.34 v1(41.402,54.974) ; v1(50.419,54.356) 50.476,54.299 51.128,54.299 52.374,53.053 52.374,49.674 53.347,48.701 54.416,48.701 55.372,49.657 55.372,53.828 64.005,62.461 65.252,62.461 65.677,62.886 67.162,62.886 68.728,61.32 70.034,61.32 70.21,61.144 70.21,57.031 72.123,55.118 83.246,55.118 83.566,55.438 87.376,55.438 87.761,55.053 87.892,54.921 88.462,54.921 v1(88.519,54.864) ; v1(92.456,51.308) 93.029,50.735 93.156,50.735 94.913,48.978 94.913,44.898 94.349,44.334 93.61,44.334 v1(93.599,44.323)
NetR23_1: R23.1 R24.1 R_RP2.2 | length 2.8
  Top Layer w0.2: R_RP2.2@87.503,41.721 87.565,41.783 88.838,41.783 R24.1@88.9,41.845
  Top Layer w0.3: R24.1@88.9,41.845 R23.1@90.297,41.845
NetR25_1: R25.1 R26.1 R_RP3.2 | length 3.2
  Top Layer w0.3: R26.1@85.217,39.562 86.171,40.516 R_RP3.2@86.171,40.894 86.139,40.927 R25.1@86.139,42.193 ; R25.1@86.106,42.226 R25.1@86.139,42.193 ; R25.1@86.106,42.226 R25.1@86.139,42.193 ; R25.1@86.106,42.226 R25.1@86.139,42.193 ; R25.1@86.106,42.226 R25.1@86.139,42.193
NetR27_2: R27.2 SW1.3 | length 8.7
  Top Layer w0.2: SW1.3@61.686,52.122 59.452,54.356 R27.2@54.648,54.356 ; R27.2@54.548,54.256 R27.2@54.598,54.306 ; R27.2@54.548,54.256 R27.2@54.648,54.356 ; R27.2@54.548,54.256 R27.2@54.598,54.306 ; R27.2@54.548,54.256 R27.2@54.598,54.306 ; R27.2@54.548,54.256 R27.2@54.598,54.306 ; R27.2@54.548,54.256 R27.2@54.598,54.306 ; R27.2@54.598,54.306 R27.2@54.648,54.356 ; R27.2@54.598,54.306 R27.2@54.648,54.356 ; R27.2@54.598,54.306 R27.2@54.648,54.356
NetR29_2: R29.2 U4.A4 | length 6.6
  Top Layer w0.3: U4.A4@67.818,58.483 67.818,58.166 68.276,57.708 68.276,57.378 68.713,56.941 69.008,56.941 69.96,55.988 69.96,55.262 71.12,54.102 R29.2@71.12,53.405
NetR30_2: R30.2 R31.2 U5.1 | length 10.5
  Top Layer w0.2: U5.1@64.13,50.292 61.966,50.292 61.849,50.175 61.849,49.149 61.849,46.472 61.966,46.355 62.357,46.355 63.678,45.034 63.994,45.034 R30.2@64.197,44.831
  Top Layer w0.3: R31.2@60.644,49.657 61.341,49.657 61.849,49.149
NetR33_2: R33.2 R34.2 U6.31 | length 9
  Top Layer w0.3: R33.2@99.506,56.769 99.506,56.737 99.704,56.539 100.306,56.539 100.567,56.278 100.567,53.83 101.373,53.024 R34.2@101.473,53.024 ; R33.2@99.506,56.855 99.704,57.054 99.791,57.054 100.653,57.916 U6.31@103.099,57.916
NetR35_2: R35.2 U6.10 | length 3.8
  Top Layer w0.2: U6.10@111.531,59.916 114.374,59.916 114.479,60.021 114.88,60.021 115.124,60.266 R35.2@115.124,60.325
NetR36_1: R36.1 U6.45 | length 6.1
  Top Layer w0.2: R36.1@105.475,49.657 106.309,49.657 106.426,49.774 106.426,50.419 108.565,52.558 U6.45@108.565,53.95
NetR37_1: R37.1 U6.43 | length 3.4
  Top Layer w0.2: R37.1@105.475,52.451 107.315,52.451 107.565,52.701 U6.43@107.565,53.95
NetR38_1: R38.1 U6.44 | length 4.6
  Top Layer w0.2: R38.1@105.475,51.054 106.553,51.054 108.065,52.566 U6.44@108.065,53.95
NetR55_2: R55.2 U8.8 | length 1.9
  Top Layer w0.3: U8.8@122.326,76.962 122.357,76.931 124.175,76.931 R55.2@124.206,76.9
NetR56_1: R56.1 U8.18 | length 1.7
  Top Layer w0.3: R56.1@110.936,70.739 111,70.675 112.56,70.675 U8.18@112.624,70.612
NetR57_1: R57.1 U8.20 | length 21
  Top Layer w0.3: R57.1@103.378,80.326 103.378,76.757 103.681,76.454 104.472,76.454 104.648,76.278 104.648,68.375 104.951,68.072 U8.20@112.624,68.072
NetR58_1: R58.1 U8.17 | length 18.5
  Top Layer w0.3: R58.1@106.172,80.326 106.234,80.264 107.442,80.264 107.696,80.01 107.696,76.249 107.52,76.073 105.713,76.073 105.537,75.897 105.537,72.39 106.045,71.882 U8.17@112.624,71.882
NetR59_1: R59.1 U8.19 | length 20.2
  Top Layer w0.3: v1(105.537,69.342) U8.19@112.624,69.342 ; v1(105.918,76.708) 106.934,76.708 107.188,76.962 107.188,78.945 107.012,79.121 106.361,79.121 R59.1@106.299,79.059
  Bottom Layer w0.3: v1(105.537,69.342) 107.382,71.187 107.382,75.244 v1(105.918,76.708)
NetR62_2: R62.2 U10.4 | length 2.9
  Top Layer w0.3: R62.2@40.64,63.308 40.754,63.308 41.279,63.833 U10.4@43.278,63.833
NetR84_2: R84.2 U11.5 | length 15.1
  Top Layer w1: R84.2@85.725,15.051 84.709,16.067 84.709,21.844 85.852,22.987 U11.5@92.074,22.987
NetR87_1: R87.1 U12.13 | length 2.3
  Top Layer w0.3: R87.1@105.221,28.321 105.406,28.136 105.406,27.998 106.33,27.074 U12.13@106.883,27.074
NetR88_1: R88.1 U13.13 | length 3.9
  Top Layer w0.3: R88.1@103.697,17.526 103.697,17.64 104.14,18.083 104.14,18.239 104.316,18.415 105.791,18.415 106.003,18.203 106.003,18.003 106.33,17.676 U13.13@106.606,17.676
NetR90_2: R90.2 U11.3 | length 11
  Top Layer w1: R90.2@94.107,14.924 v1(94.107,16.764) ; U11.3@96.902,21.717 v1(99.06,21.717)
  Bottom Layer w1: v1(94.107,16.764) v1(99.06,21.717)
NetR98_2: R98.2 U16.1 | length 31.9
  Top Layer w0.3: v1(3.861,62.916) 3.942,62.916 4.113,62.746 U16.1@4.945,62.746 ; v1(15.24,65.317) 29.122,65.317 31.242,67.437 R98.2@31.242,68.937
  Bottom Layer w0.3: v1(3.861,62.916) 10.592,62.916 12.954,65.278 15.201,65.278 v1(15.24,65.317)
NetR99_2: R99.2 U16.3 | length 32.3
  Top Layer w0.3: v1(3.175,61.976) 3.256,61.976 3.486,61.746 U16.3@4.945,61.746 ; v1(13.335,66.167) 14.676,66.167 14.826,66.317 15.654,66.317 15.804,66.167 23.876,66.167 25.654,67.945 25.654,68.81 R99.2@25.781,68.937
  Bottom Layer w0.3: v1(3.175,61.976) 3.175,62.057 2.981,62.251 2.981,67.065 3.369,67.453 9.509,67.453 10.844,66.118 13.286,66.118 v1(13.335,66.167)
NetR100_2: R100.2 U16.5 | length 32.2
  Top Layer w0.3: v1(2.187,60.198) 2.244,60.255 2.586,60.255 2.588,60.258 2.969,60.258 3.457,60.746 U16.5@4.945,60.746 ; v1(10.795,67.691) 10.876,67.691 11.299,67.268 19.262,67.268 20.066,68.072 R100.2@20.066,68.937
  Bottom Layer w0.3: v1(2.187,60.198) 2.13,60.255 2.13,60.468 2.115,60.482 2.115,69.044 2.711,69.64 8.846,69.64 v1(10.795,67.691)
NetR101_2: R101.2 U16.7 | length 29.6
  Top Layer w0.3: v1(2.286,58.547) 2.326,58.587 2.707,58.587 3.866,59.746 U16.7@4.945,59.746 ; v1(11.684,69.342) 11.765,69.342 11.888,69.219 14.196,69.219 R101.2@14.478,68.937
  Bottom Layer w0.3: v1(2.286,58.547) 1.187,59.646 1.187,70.436 1.363,70.612 10.414,70.612 v1(11.684,69.342)
NetR106_2: R106.2 U17.3 | length 3.8
  Top Layer w0.6: R106.2@59.628,19.051 60.186,19.609 U17.3@63.246,19.609
NetR107_1: R107.1 U16.27 | length 4.6
  Top Layer w0.3: U16.27@8.144,63.444 8.167,63.467 8.167,64.174 8.59,64.597 11.548,64.597 11.746,64.399 R107.1@11.746,64.389
NetR108_1: R108.1 U16.26 | length 4.2
  Top Layer w0.3: U16.26@8.644,63.444 8.667,63.467 8.667,63.887 8.951,64.172 10.566,64.172 11.461,63.277 11.548,63.277 11.746,63.078 R108.1@11.746,62.992
NetR109_1: R109.1 U17.22 | length 5.3
  Top Layer w0.6: U17.22@72.898,19.609 72.919,19.588 74.151,19.588 74.191,19.548 75.774,19.548 76.336,18.985 R109.1@77.978,18.985
NetR116_2: R116.2 R120.1 | length 1.4
  Top Layer w0.2: R120.1@71.247,80.072 R116.2@72.644,80.072
NetR117_2: R117.2 R121.1 | length 1.4
  Top Layer w0.2: R121.1@77.724,79.945 R117.2@79.121,79.945
NetR118_2: R118.2 R122.1 | length 1.4
  Top Layer w0.2: R122.1@83.693,79.945 R118.2@85.09,79.945
NetR119_2: R119.2 R123.1 | length 1.4
  Top Layer w0.2: R123.1@89.535,80.072 R119.2@90.932,80.072
NetR140_2: R140.2 R145.2 U23.1 | length 3
  Top Layer w0.5: R145.2@91.248,32.258 91.28,32.225 91.28,30.959 R140.2@91.313,30.926 92.465,30.926 92.593,30.797 U23.1@92.939,30.797
NetR141_2: R141.2 R146.2 U24.1 | length 3.3
  Top Layer w0.8: R141.2@82.55,31.434 82.583,31.402 83.849,31.402 R146.2@83.882,31.369 83.932,31.319 83.932,30.787 84.581,30.138 84.581,30.025 84.697,29.909 U24.1@84.811,29.909
NetR142_2: R142.2 R147.2 U25.1 | length 3
  Top Layer w0.5: R147.2@99.379,35.941 R142.2@99.379,34.544 100.868,34.544 100.901,34.578 U25.1@100.901,34.646
NetR143_2: R143.2 R148.2 U26.1 | length 3
  Top Layer w0.5: R143.2@89.981,34.444 90.16,34.265 U26.1@91.504,34.265 ; R143.2@89.981,34.544 R148.2@89.981,35.941
NetR144_2: R144.2 R149.2 U27.1 | length 3
  Top Layer w0.2: U27.1@97.815,69.659 97.847,69.628 99.344,69.628 R149.2@99.376,69.596 R144.2@99.376,68.199
NetR156_2: R156.2 R157.2 U29.5 | length 6
  Top Layer w0.2: U29.5@39.727,49.686 39.727,50.546 ; R156.2@40.259,52.175 39.727,51.643 39.727,50.546 ; R157.2@42.164,52.175 42.164,51.943 41.529,51.308 40.489,51.308 39.727,50.546
NetR161_2: R161.2 U30.17 | length 5.2
  Top Layer w0.3: R161.2@18.415,44.693 18.59,44.693 20.918,42.365 U30.17@22.674,42.365
NetR162_2: R162.2 U29.7 | length 5.4
  Top Layer w0.2: R162.2@36.819,52.07 36.129,52.07 36.012,51.953 36.012,50.983 36.251,50.744 38.285,50.744 38.727,50.302 U29.7@38.727,49.686
NetR163_2: R163.2 U29.8 | length 7.7
  Top Layer w0.2: R163.2@36.819,53.975 35.804,53.975 35.687,53.858 35.687,50.546 35.814,50.419 38.1,50.419 38.227,50.292 U29.8@38.227,49.686
NetR165_2: R165.2 U30.10 | length 6.9
  Top Layer w0.3: U30.10@26.324,42.365 27.379,42.365 28.133,43.119 31.017,43.119 32.21,44.312 R165.2@32.385,44.312
NetR166_2: R166.2 U30.18 | length 7
  Top Layer w0.2: R166.2@17.526,37.846 17.787,38.525 19.267,39.861 20.28,40.854 21.291,41.865 U30.18@22.674,41.865
NetR168_1: R168.1 U28.7 | length 1.9
  Top Layer w0.3: U28.7@50.874,50.493 52.387,50.493 R168.1@52.694,50.8
NetR169_1: R169.1 U28.8 | length 2.5
  Top Layer w0.3: U28.8@50.874,51.143 51.024,51.143 52.123,52.242 52.352,52.242 52.694,52.584 R169.1@52.694,52.705
NetR173_1: R173.1 U29.13 | length 2.4
  Top Layer w0.3: R173.1@37.338,44.969 37.338,45.544 37.514,45.72 37.973,45.72 38.227,45.974 U29.13@38.227,46.736
NetR177_2: R177.2 U32.3 | length 4.6
  Top Layer w0.5: R177.2@43.572,32.258 44.704,32.258 45.471,33.025 U32.3@47.864,33.025
NetR178_2: R178.2 U33.3 | length 5.2
  Top Layer w0.5: R178.2@42.048,35.814 42.127,35.893 43.005,35.893 44.135,37.023 U33.3@46.729,37.023
NetR180_1: R180.1 U31.7 | length 3.6
  Top Layer w0.3: U31.7@56.94,41.727 56.968,41.755 57.884,41.755 58.42,42.291 59.133,42.291 59.309,42.467 R180.1@59.309,43.423
NetR181_1: R181.1 U31.3 | length 15.7
  Top Layer w0.3: R181.1@51.689,29.094 51.689,31.369 54.119,33.799 54.119,36.051 53.992,36.178 53.992,36.539 53.684,36.847 53.323,36.847 51.816,38.354 51.816,40.767 52.126,41.077 U31.3@53.55,41.077
NetTP1_1: TP1.1 U1.14 | length 7.7
  Top Layer w0.2: U1.14@17.653,29.075 18.641,29.075 18.787,29.221 21.601,29.221 23.03,30.65 24.427,30.65 TP1.1@24.638,30.861
NetTP2_1: TP2.1 U12.10 | length 11.3
  Top Layer w0.5: U12.10@112.522,25.774 116.312,25.774 116.686,25.4 v1(116.713,25.4)
  Bottom Layer w0.5: v1(116.713,25.4) TP2.1@123.698,25.4
NetU3_30: U3.30 XTAL1.3 | length 5.7
  Top Layer w0.2: U3.30@70.536,32.645 70.511,32.62 70.511,31.989 70.282,31.76 70.282,31.28 70.296,31.266 70.296,29.474 70.296,28.508 70.301,28.503 70.301,28.252 71.086,27.467 XTAL1.3@71.213,27.467
NetU3_31: U3.31 XTAL1.1 | length 12.3
  Top Layer w0.2: v1(70.826,28.55) 70.902,28.626 70.902,29.327 70.621,29.609 70.621,31.131 70.936,31.446 U3.31@70.936,32.645 ; v1(71.546,24.003) 73.172,24.003 73.289,24.12 73.289,25.34 XTAL1.1@73.315,25.366
  Bottom Layer w0.2: v1(70.826,28.55) 70.826,25.502 71.546,24.782 v1(71.546,24.003)
NODE_AI0_CLAMP: CR4.1 F3.1 R63.1 | length 7
  Top Layer w0.2: R63.1@34.036,70.423 34.136,70.423 34.669,70.956 35.19,70.956 CR4.1@36.116,71.882 ; CR4.1@36.055,71.882 35.005,72.932 35.005,73.893 35.288,74.176 35.785,74.176 36.068,74.459 F3.1@36.068,75.076
NODE_AI0_PROT: C72.2 CR8.1 R63.2 R68.1 R73.1 | length 22.2
  Top Layer w0.2: R63.2@34.036,69.023 34.228,69.215 40.894,69.215 41.529,69.85 41.529,73.787 41.91,74.168 42.418,74.168 ; C72.2@38.989,76.367 39.096,76.474 40.214,76.474 R68.1@40.321,76.581 40.321,76.681 40.983,77.343 41.005,77.343 41.123,77.46 CR8.1@41.123,78.359 41.468,78.359 41.601,78.226 41.601,77.717 42.672,76.646 42.672,74.422 42.418,74.168 ; R73.1@42.418,73.471 42.418,74.168
NODE_AI1_CLAMP: CR5.1 F4.1 R64.1 | length 7.3
  Top Layer w0.2: R64.1@44.196,70.423 44.196,71.247 44.831,71.882 ; F4.1@45.085,75.33 44.958,75.203 44.958,74.676 44.323,74.041 44.323,72.39 44.831,71.882 ; CR5.1@46.276,71.501 45.895,71.882 44.831,71.882
NODE_AI1_PROT: C73.2 CR9.1 R64.2 R69.1 R75.1 | length 22.6
  Top Layer w0.2: R64.2@44.196,69.023 51.116,69.023 51.578,69.485 51.578,70.263 51.689,70.374 51.689,73.543 51.806,73.66 52.284,73.66 ; C73.2@48.895,76.24 49.006,76.24 49.347,76.581 R69.1@50.227,76.581 50.227,76.681 50.775,77.229 CR9.1@50.775,78.359 51.12,78.359 52.284,77.195 52.284,73.66 ; R75.1@52.705,72.709 52.705,73.543 52.588,73.66 52.284,73.66
NODE_AI2_CLAMP: CR6.1 F5.1 R65.1 | length 13.3
  Top Layer w0.2: CR6.1@56.182,72.009 CR6.1@56.121,72.009 ; 54.737,73.393 F5.1@54.737,75.203 ; 54.737,73.393 F5.1@54.737,75.203 ; 54.737,73.393 F5.1@54.737,75.203 ; 54.737,73.393 F5.1@54.737,75.203 ; 54.737,73.393 CR6.1@56.121,72.009 ; R65.1@55.434,69.088 R65.1@55.434,69.188 ; R65.1@55.434,69.088 R65.1@55.434,69.188 ; R65.1@55.434,69.088 R65.1@55.434,69.188 ; R65.1@55.434,69.088 R65.1@55.434,69.188 ; R65.1@55.434,69.188 54.737,69.885 54.737,70.625 CR6.1@56.121,72.009